# Altium PCB ModuMIDI.PcbDoc (part 2 of 2)
Units mil, origin at the board's own origin, x right, y up, seen from the top; angles counter-clockwise.
Board outline 9987.45 x 7920 mil, 2 copper layers (Top Layer, Bottom Layer), stack 62.19 mil thick; 170 components, 117 nets, 494 pads, 132 vias.
Unrouted connection lines stored in the file: 1.
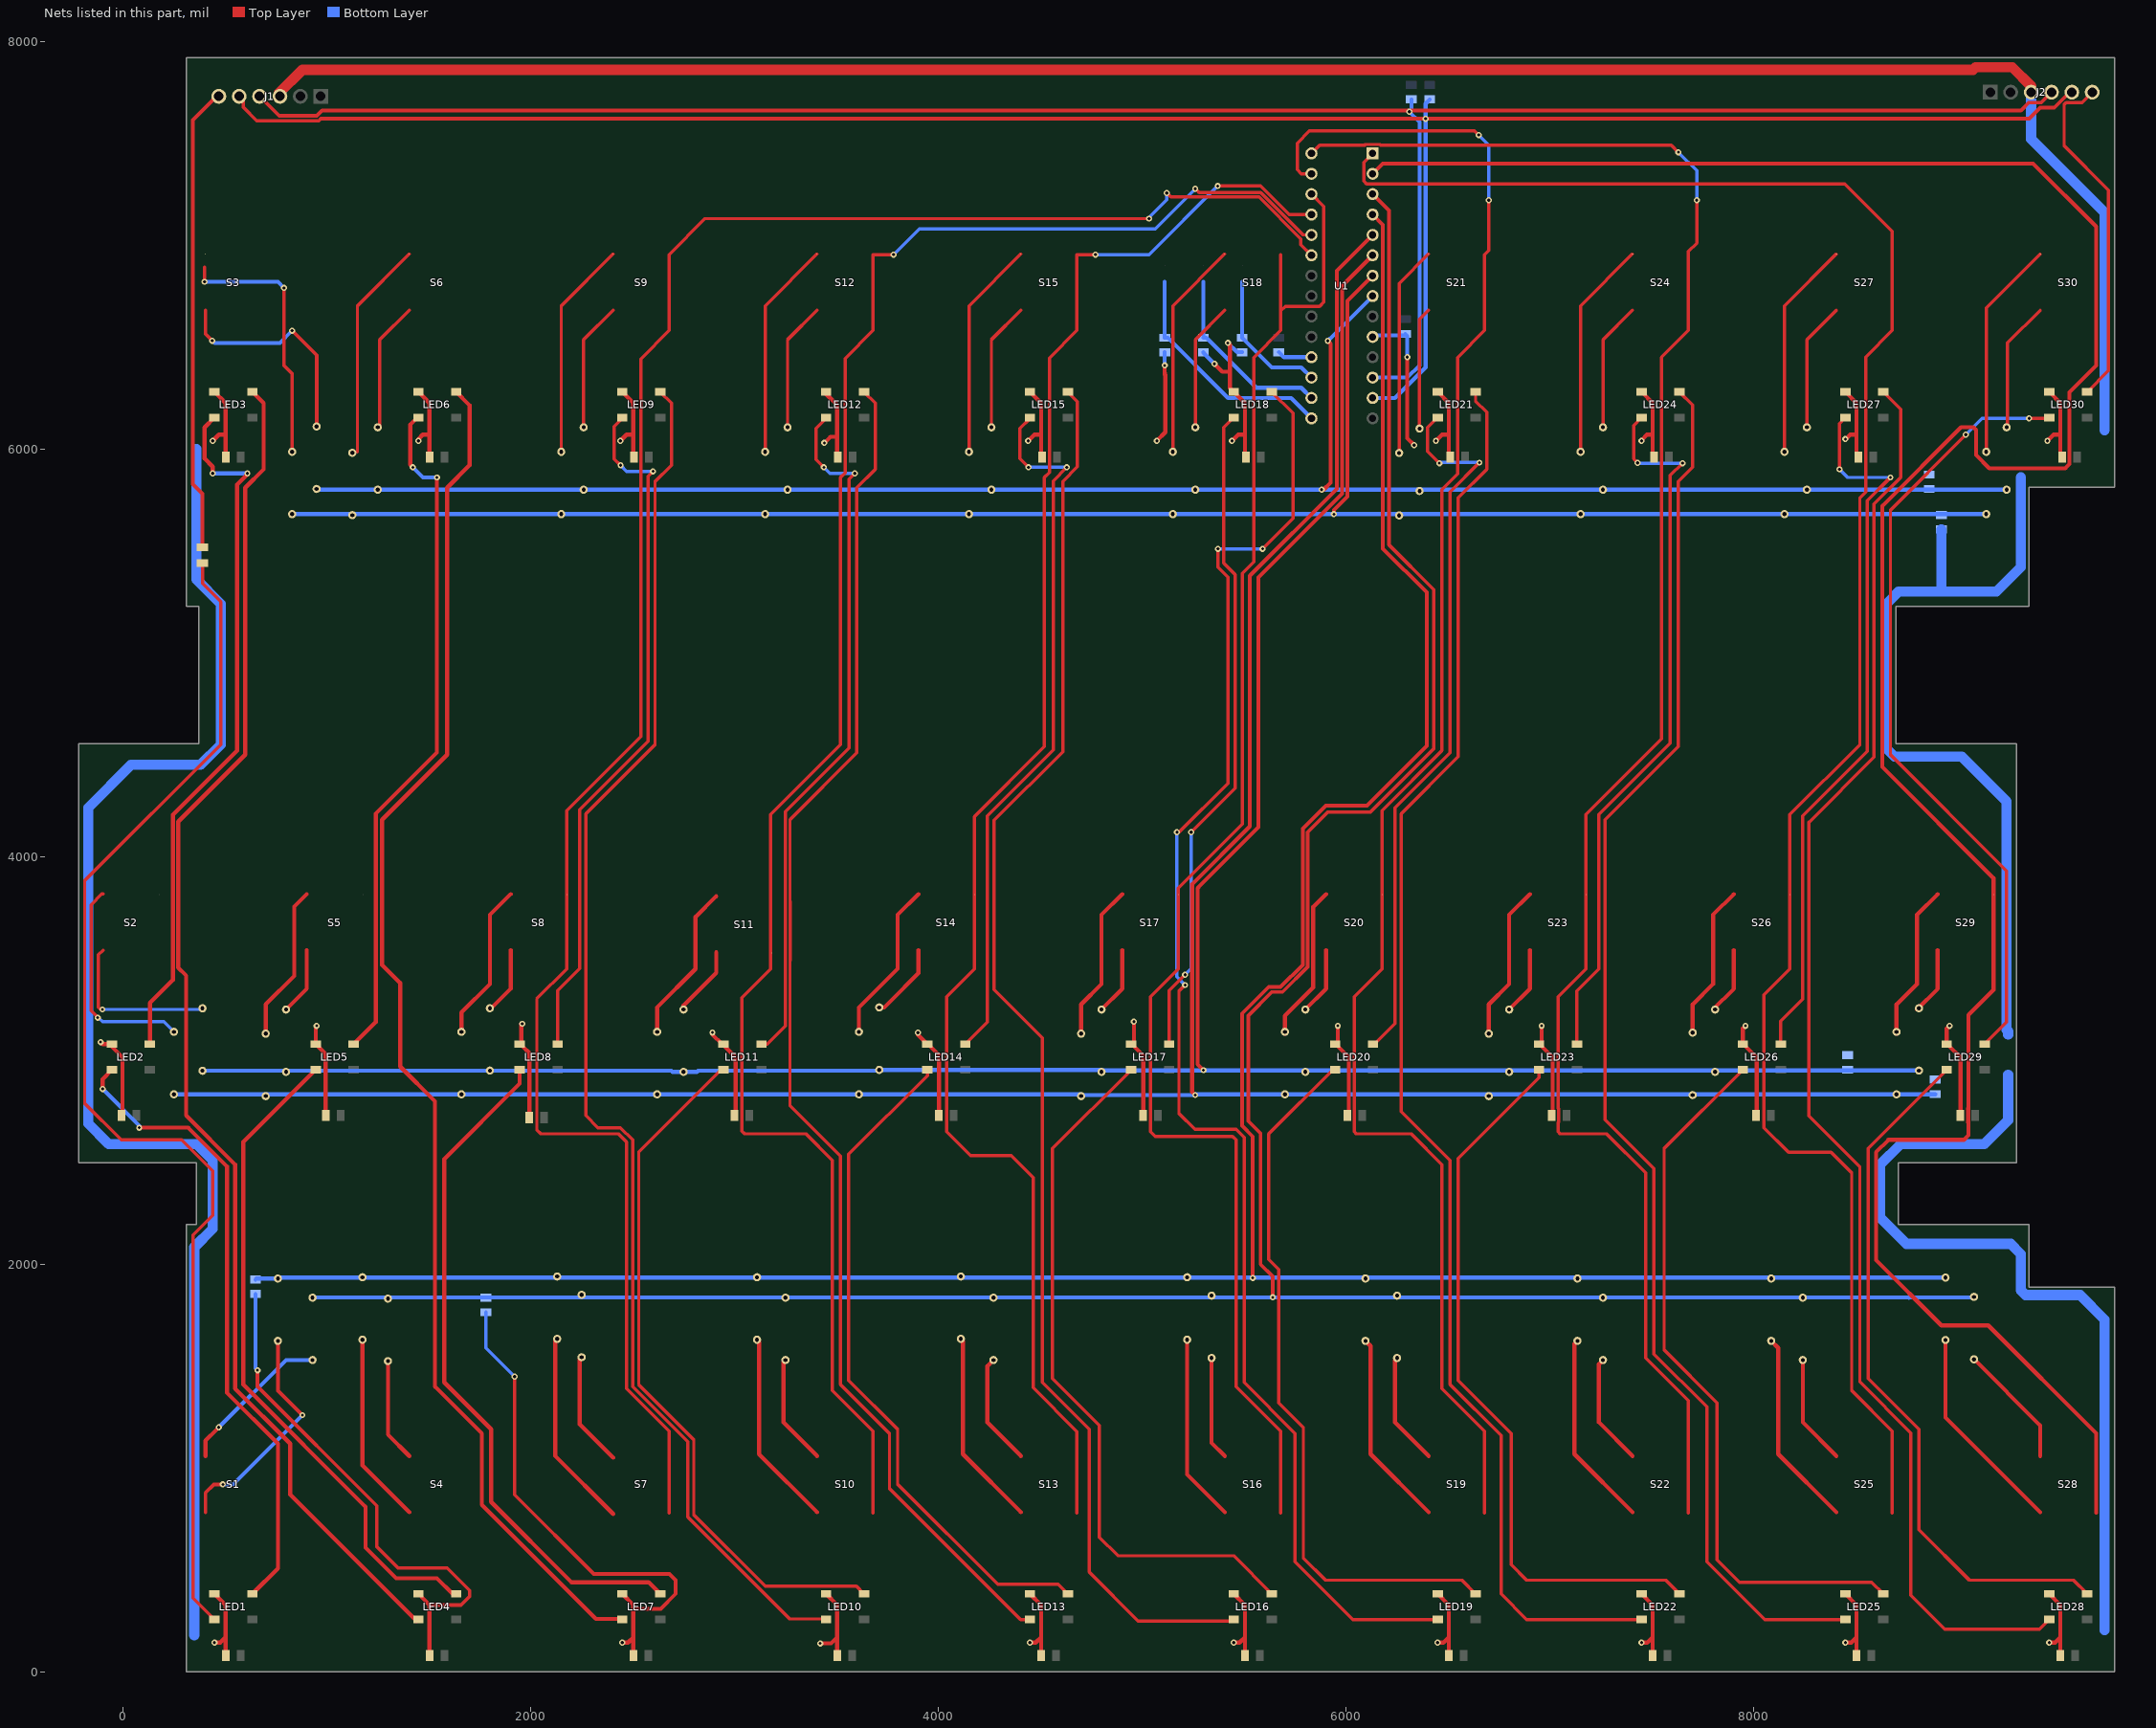
[diagram p2: the nets of this part, all layers, seen from the top]

## Via types
v1: diameter 30, hole 15, Top Layer to Bottom Layer, 123 vias
v2: diameter 60, hole 30, Top Layer to Bottom Layer, tented top, 9 vias

## Nets (pads, with @x,y where several pads share a name; then routed paths per layer and width w, separated by ;. In a path a pad name is that pad's centre, name@x,y a point inside that pad or via, vN(x,y) a via of type N, cw(c..) or ccw(c..) an arc to the next point about the centre after c; other vN are vias at no path point) (continued)
C2: S7.1 S7.3 S8.1 S8.3 S9.1 S9.3 U1.23 | length 10374.1
  Top Layer w16: S7.3@2679.17,780.63 S7.1@2679.17,1056.22 2679.17,1180.83 2470,1390 2470,2600 2430,2640 2050,2640 2030,2660 2030,3302 2176.17,3448.17 S8.3@2176.17,3537.63 S8.1@2176.17,3813.22 2176.17,4226.17 2540,4590 2540,6441.78 2679.17,6580.94 S9.3@2679.17,6677.63 S9.1@2679.17,6953.22 2855.94,7130 v1(5033.22,7130) ; v1(5120,7254.98) 5121.02,7254.98 5140,7236 5572.28,7236 5777.17,7031.12 5777.17,7002.83 U1.23@5830,6950
  Bottom Layer w16: v1(5033.22,7130) 5033.22,7136.42 5120,7223.2 v1(5120,7254.98)
C3: S10.1 S10.3 S11.1 S11.3 S12.1 S12.3 U1.24 | length 9259.1
  Top Layer w16: S10.3@3679.17,780.63 S10.1@3679.17,1056.22 3679.17,1180.83 3480,1380 3480,2510 3350,2640 3050,2640 3036.67,2653.33 3036.67,3308.67 3176.17,3448.17 3176.17,3802.54 3176.17,4206.17 3520,4550 3520,5860 3542.48,5882.48 3542.48,6444.26 3679.17,6580.94 S12.3@3679.17,6677.63 S12.1@3679.17,6953.22 v1(3780,6953.22) ; v1(5260,7276.45) 5269.83,7266.62 5270,7266.62 5278.62,7258 5581.4,7258 5789.4,7050 U1.24@5830,7050
  Bottom Layer w16: v1(3780,6953.22) 3906.78,7080 4404.83,7080 5063.55,7080 v1(5260,7276.45)
C4: S13.1 S13.3 S14.1 S14.3 S15.1 S15.3 U1.25 | length 8168
  Top Layer w16: S13.3@4679.17,780.63 S13.1@4679.17,1056.22 4679.17,1179.72 4464.97,1393.92 4464.97,2425.8 4357.87,2532.9 4157.1,2532.9 4040,2650 4040,3312 4176.17,3448.17 S14.3@4176.17,3537.63 S14.1@4176.17,3813.22 4176.17,4196.17 4520,4540 4520,5860 4544.4,5884.4 4544.4,6095.6 4544.4,6446.18 4679.17,6580.94 S15.3@4679.17,6677.63 S15.1@4679.17,6953.22 v1(4770,6953.22) ; v1(5370,7290) 5580.51,7290 5720.51,7150 U1.25@5830,7150
  Bottom Layer w16: v1(4770,6953.22) 5033.22,6953.22 v1(5370,7290)
C5: S16.1 S16.3 S17.1 S17.3 S18.1 S18.3 U1.26 | length 7707.9
  Top Layer w16: S16.3@5679.17,780.63 S16.1@5679.17,1056.22 5679.17,1180.83 5460,1400 5460,2610 5442.78,2627.22 5062.78,2627.22 5040,2650 5040,3312 5176.17,3448.17 S17.3@5176.17,3537.63 S17.1@5176.17,3813.22 5176.17,3846.17 5490,4160 5490,5390 5546.51,5446.51 5546.51,6448.29 5679.17,6580.94 S18.3@5679.17,6677.63 ; S18.1@5679.17,6953.22 S18.3@5679.17,6677.63 ; U1.26@5830,7250 5890,7190 5890,6720 5870,6700 5701.54,6700 S18.3@5679.17,6677.63
C6: S19.1 S19.3 S20.1 S20.3 S21.1 S21.3 U1.27 | length 8607.1
  Top Layer w16: U1.27@5830,7350 5780,7350 5760,7370 5760,7500 5820,7560 6630,7560 v1(6650,7540) ; S19.3@6679.17,780.63 S19.1@6679.17,1056.22 6679.17,1180.83 6470,1390 6470,2488.89 6318.89,2640 6050,2640 6040,2650 6040,3312 6176.17,3448.17 S20.3@6176.17,3537.63 S20.1@6176.17,3813.22 6176.17,4226.17 6470,4520 6470,5800 6546.79,5876.79 6546.79,5989.52 6546.79,6448.57 6679.17,6580.94 S21.3@6679.17,6677.63 S21.1@6679.17,6953.22 6700,6974.06 v1(6700,7220)
  Bottom Layer w16: v1(6650,7540) 6700,7490 v1(6700,7220)
C7: S22.1 S22.3 S23.1 S23.3 S24.1 S24.3 U1.28 | length 9227.1
  Top Layer w16: U1.28@5830,7450 5870,7490 6091.15,7490 6094.67,7493.53 6165.33,7493.53 6168.85,7490 7595.2,7490 v1(7629.7,7455.5) ; S22.3@7679.17,780.63 S22.1@7679.17,1056.22 7679.17,1330.83 7470,1540 7470,2447.77 7277.77,2640 7050,2640 7040,2650 7040,2694.8 7041.84,2696.64 7041.84,2763.36 7040,2765.2 7040,3312 7176.17,3448.17 S23.3@7176.17,3537.63 S23.1@7176.17,3813.22 7176.17,4206.17 7547.61,4577.61 7547.61,6449.39 7679.17,6580.94 S24.3@7679.17,6677.63 S24.1@7679.17,6953.22 7679.17,6969.17 7720,7010 v1(7720,7220)
  Bottom Layer w16: v1(7629.7,7455.5) 7720,7365.2 v1(7720,7220)
C8: S25.1 S25.3 S26.1 S26.3 S27.1 S27.3 U1.1 | length 9779.2
  Top Layer w16: U1.1@6130,7450 6086.47,7406.47 6086.47,7313.53 6100,7300 8446.06,7300 8679.17,7066.89 S27.1@8679.17,6953.22 S27.3@8679.17,6677.63 8679.17,6580.94 8549.09,6450.87 8549.09,5789.09 8520,5760 8520,4550 8176.17,4206.17 S26.1@8176.17,3813.22 S26.3@8176.17,3537.63 8176.17,3448.17 8050,3322 8050,2670 8170,2550 8378.89,2550 8480,2448.89 8480,1380 8679.17,1180.83 S25.1@8679.17,1056.22 S25.3@8679.17,780.63
C9: S28.1 S28.3 S29.1 S29.3 S30.1 S30.3 U1.2 | length 12363.7
  Top Layer w20: U1.2@6130,7350 6180,7400 9370,7400 9679.17,7090.83 S30.1@9679.17,6953.22 S30.3@9679.17,6677.63 9679.17,6409.17 9547.95,6277.95 9547.95,5994.52 9548.28,5994.19 9548.28,5925.81 9527.47,5905 9155,5905 9090,5970 9090,6093.14 9076.95,6106.18 9016.18,6106.18 8630,5720 8630,4440 9176.17,3893.83 S29.1@9176.17,3813.22 S29.3@9176.17,3537.63 9176.17,3346.17 9052.95,3222.95 9052.95,2765.42 9051.72,2764.19 9051.72,2695.81 9052.95,2694.58 9052.95,2632.64 9030.31,2610 8660,2610 8600,2550 8600,2020 8920,1700 9150,1700 9679.17,1170.83 S28.1@9679.17,1056.22 S28.3@9679.17,780.63
CLK: J1.4 J2.4 R6.1 U1.12 | length 10464.7
  Top Layer w18: J1.4@670,7730 766.18,7633.82 951.02,7633.82 977.2,7660 v1@6310,7660 ; v1(6310,7654) 6316,7660 9310,7660 9348.78,7698.78 9408.78,7698.78 J2.4@9460,7750
  Bottom Layer w18: U1.12@6130,6350 6300,6350 6360,6410 6360,7604 v1(6310,7654) 6320,7664 R6.1@6320,7714.57
Data: J1.5 J2.5 R5.1 U1.13 | length 10754.4
  Top Layer w18: J1.5@590,7730.06 590,7676.14 656.32,7609.82 960.96,7609.82 971.14,7620 v1(6390,7620) 9350,7620 9404.78,7674.78 9473.89,7674.78 9549.11,7750 J2.5@9560,7750
  Bottom Layer w20: U1.13@6130,6250 6240,6250 6390,6400 v1(6390,7620) 6390,7694.57 R5.1@6410,7714.57
GND: C1.2 C2.2 C3.2 C4.2 C5.2 C6.2 C7.2 C8.2 C9.2 C10.2 C11.2 C12.2 C13.2 C14.2 C15.2 C16.2 C17.2 C18.2 C19.2 C20.2 C21.2 C22.2 C23.2 C24.2 C25.2 C26.2 C27.2 C28.2 C29.2 C30.2 C31.2 J1.3 J2.3 LED1.3 LED2.3 LED3.3 LED4.3 LED5.3 LED6.3 LED7.3 LED8.3 LED9.3 LED10.3 LED11.3 LED12.3 LED13.3 LED14.3 LED15.3 LED16.3 LED17.3 LED18.3 LED19.3 LED20.3 LED21.3 LED22.3 LED23.3 LED24.3 LED25.3 LED26.3 LED27.3 LED28.3 LED29.3 LED30.3 R0.1 R1.1 R2.1 R7.1 R8.1 R9.1 R10.1 R11.1 R12.1 U1.10 | length 44179.3
  Top Layer w18: v1(660,1480) 660,1400.23 1245.11,815.11 1245.11,614.89 1350,510 1590,510 1700.23,399.77 1700.23,370.23 1658.41,328.41 1503.58,328.41 ; LED4.3@1449,382.99 1473.71,358.28 ; v1(1920.85,1448.48) 1920.85,869.15 2310,480 2680,480 2710.57,449.43 2710.57,382.99 2637.57,310 2503.58,310
  Top Layer w20: v1(-110,3090) -100,3080 LED2.3@-70,3080 ; LED2.3@-57,3070 -2.42,3015.42 C2.2@-2.42,2750.01 ; v1(440.12,6039.52) 470.61,6070 503.58,6070 ; v1(449,143.58) 477.17,143.58 503.58,170 ; LED1.3@449,382.99 503.58,328.41 503.58,170 ; LED3.3@449,6279.99 503.58,6225.41 503.58,6070 ; C1.2@503.58,80 503.58,170 ; C3.2@503.58,5960 503.58,6070 ; v1(950,3170) 946,3166 LED5.3@946,3079.99 994.22,3031.77 C5.2@994.22,2743.99 ; v1(1449,6040) 1449,6048.39 1470.61,6070 1503.58,6070 ; LED6.3@1449,6279.99 1503.58,6225.41 1503.58,6070 ; 1473.71,358.28 1503.58,328.41 C4.2@1503.58,80 ; C6.2@1503.58,5960 1503.58,6070 ; LED8.3@1946,3079.99 1954.01,3088 1954.01,3180 v1(1959,3180) ; LED8.3@1959,3069.99 1993.58,3035.41 C8.2@1993.58,2731.99 ; v1(2440.12,6039.52) 2470.61,6070 2503.58,6070 ; v1(2449,143.58) 2477.17,143.58 2503.58,170 ; LED7.3@2449,382.99 2503.58,328.41 2503.58,310 2503.58,170 ; LED9.3@2449,6279.99 2503.58,6225.41 2503.58,6070 ; C7.2@2503.58,80 2503.58,170 ; C9.2@2503.58,5960 2503.58,6070 ; v1(2891.78,3137.04) 2891.78,3126.5 LED11.3@2937.78,3080.5 ; LED11.3@2950.78,3070.5 3005.36,3015.92 C11.2@3005.36,2750.51 ; v1(3420,140) 3473.58,140 3503.58,170 ; v1(3440.12,6029.52) 3470.61,6060 3503.58,6060 ; LED10.3@3449,382.99 3503.58,328.41 3503.58,170 ; LED12.3@3449,6269.99 3503.58,6215.41 3503.58,6060 ; C10.2@3503.58,80 3503.58,170 ; C12.2@3503.58,5950 3503.58,6060 ; v1(3900,3136.53) 3900,3125.99 LED14.3@3946,3079.99 ; LED14.3@3959,3069.99 4002.47,3026.52 C14.2@4002.47,2730 ; v1(4440.12,6039.52) 4470.61,6070 4503.58,6070 ; v1(4449,143.58) 4477.17,143.58 4503.58,170 ; LED13.3@4449,382.99 4503.58,328.41 4503.58,170 ; LED15.3@4449,6279.99 4503.58,6225.41 4503.58,6070 ; C13.2@4503.58,80 4503.58,170 ; C15.2@4503.58,5960 4503.58,6070 ; LED17.3@4946,3079.99 4959,3092.99 v1(4959,3190) ; LED17.3@4959,3069.99 5004.69,3024.3 C17.2@5004.69,2730 ; v1(5071.39,6040.1) 5113.38,6082.08 5113.38,6362.63 5111.07,6364.94 5111.07,6371.34 5110,6372.41 v1(5110,6410) ; v1(5353.96,6417.68) 5392.64,6379 5430,6379 ; v1(5420,6520) 5430,6510 5430,6379 ; v1(5440.12,6039.52) 5470.61,6070 5503.58,6070 ; v1(5449,143.58) 5477.17,143.58 5503.58,170 ; LED16.3@5449,382.99 5503.58,328.41 5503.58,170 ; C16.2@5503.58,80 5503.58,170 ; C18.2@5503.58,5960 5503.58,6070 ; LED20.3@5946,3079.99 5959,3092.99 v1(5959,3170) ; LED20.3@5959,3069.99 6013.58,3015.41 C20.2@6013.58,2750 ; v1(6300,6450) 6300,6052.45 v1(6333.94,6018.52) ; v1(6440.12,6039.52) 6470.61,6070 6503.58,6070 ; v1(6449,143.58) 6477.17,143.58 6503.58,170 ; LED19.3@6449,382.99 6503.58,328.41 6503.58,170 ; LED21.3@6449,6279.99 6503.58,6225.41 6503.58,6070 ; C19.2@6503.58,80 6503.58,170 ; C21.2@6503.58,5960 6503.58,6070 ; LED23.3@6946,3079.99 6960,3093.99 6959,3094.99 v1(6959,3170) ; LED23.3@6959,3069.99 7013.58,3015.41 C23.2@7013.58,2750 ; v1(7449,143.58) 7477.17,143.58 7503.58,170 ; LED22.3@7449,382.99 7503.58,328.41 7503.58,170 ; v1(7449,6039.52) 7449,6042.22 7463.58,6056.8 7463.58,6058.28 7475.3,6070 7503.58,6070 ; LED24.3@7449,6279.99 7503.58,6225.41 7503.58,6070 ; C22.2@7503.58,80 7503.58,170 ; C24.2@7503.58,5960 7503.58,6070 ; LED26.3@7946,3079.99 7946,3157 v1(7959,3170) ; LED26.3@7959,3069.99 8013.58,3015.41 C26.2@8013.58,2750 ; v1(8449,143.58) 8477.17,143.58 8503.58,170 ; LED25.3@8449,382.99 8503.58,328.41 8503.58,170 ; v1(8449,6048.39) 8451.71,6048.39 8473.31,6070 8503.58,6070 ; LED27.3@8449,6279.99 8503.58,6225.41 8503.58,6070 ; C25.2@8503.58,80 8503.58,170 ; C27.2@8503.58,5960 8503.58,6070 ; LED29.3@8946,3079.99 8946,3156 v1(8960,3170) ; LED29.3@8959,3069.99 9013.58,3015.41 C29.2@9013.58,2750 ; v1(9440.12,6039.52) 9470.61,6070 9503.58,6070 ; v1(9449,143.58) 9477.17,143.58 9503.58,170 ; LED28.3@9449,382.99 9503.58,328.41 9503.58,170 ; LED30.3@9449,6279.99 9503.58,6225.41 9503.58,6070 ; C28.2@9503.58,80 9503.58,170 ; C30.2@9503.58,5960 9503.58,6070 ; 5430,6379 5430,6298.99 LED18.3@5449,6279.99 5503.58,6225.41 5503.58,6070
  Top Layer w50: J1.3@764.61,7744.61 880,7860 9074.52,7860 9087.74,7873.22 9266.78,7873.22 9360,7780 J2.3@9360,7750
  Bottom Layer w18: R8.1@650,1854.57 650,1490 v1(660,1480) ; R7.1@1780,1764.57 1780,1589.34 v1(1920.85,1448.48)
  Bottom Layer w20: v1(5110,6410) R0.1@5110,6474.57 ; R1.1@5300,6474.57 5300,6471.64 v1(5353.96,6417.68) ; v1(5420,6520) 5465.43,6474.57 R2.1@5490,6474.57 ; U1.10@6130,6550 6136.69,6556.69 6283.11,6556.69 C31.2@6290,6563.58 6300,6553.58 v1(6300,6450)
  Bottom Layer w50: 350,180.37 350,2084 440,2174 440,2510 360,2590 -70,2590 -170,2690 -170,4240 40,4450 380,4450 480,4550 480,5240 360,5360 360,6000 ; R11.1@8920,5604.57 8920,5310 8930,5300 ; 9247.47,2930 9247.47,2707.47 9130,2590 8720,2590 8620,2490 8620,2228.97 8668.97,2180 8668.97,2179.65 8692.4,2156.22 8692.75,2156.22 8748.97,2100 9260.22,2100 9310.22,2050 9310.22,1872.11 9333.65,1848.68 9600,1848.68 9720,1728.68 9720,205.23 ; 9247.47,3127.52 9247.47,3142.53 9240,3150 9240,4270 9020,4490 8690,4490 8650,4530 8650,5240 8710,5300 8930,5300 ; 9310,5860 9310.22,5859.78 9310.22,5778.1 9310,5777.88 9310,5420 9190,5300 8930,5300 ; J2.3@9360,7749.26 9360,7520 9720,7160 9720,6092.37
LED_CTRL: J1.6 R4.1 | length 2281.4
  Top Layer w18: R4.1@390,5516.77 390,5780 342.83,5827.17 342.83,7612.6 J1.6@460.24,7730
LED_Next: J2.6 LED30.2 | length 1706.8
  Top Layer w16: LED30.2@9635,6279.99 9740,6384.99 9740,7270 9522.05,7487.95 9522.05,7690.41 9531.42,7699.78 9609.78,7699.78 J2.6@9660,7750
NetD1_2: D1.2 S1.0 | length 764.3
  Top Layer w20: S1.0@404.83,1059.37 404.83,1134.83 460,1190 v1(470,1200)
  Bottom Layer w20: v1(470,1200) 800,1530 D1.2@930,1530
NetD2_2: D2.2 S1.2 | length 1141.6
  Top Layer w18: S1.2@404.83,783.78 404.83,878.83 446,920 v1(490,920) ; D2.2@760,1623.82 760,1380 v1(880,1260)
  Bottom Layer w18: v1(490,920) 540,920 v1(880,1260)
NetD3_2: D3.2 S2.0 | length 1050.2
  Top Layer w16: v1(-124,3210) -124,3211.47 -156.5,3243.97 -156.5,3763.5 -103.63,3816.37 S2.0@-98.17,3816.37
  Bottom Layer w16: v1(-124,3210) -120.21,3210 -100.21,3190 200,3190 D3.2@250,3140
NetD4_2: D4.2 S2.2 | length 806.3
  Top Layer w16: v1(-101,3250) -110,3250 -120,3260 -120,3518.95 S2.2@-98.17,3540.78
  Bottom Layer w16: v1(-101,3250) 384.34,3250 D4.2@390,3255.66
NetD5_2: D5.2 S3.0 | length 1294.3
  Top Layer w18: v1(400,6820) 400,6891.54 ; v1(790,6790) 790,6409.44 830,6369.44 D5.2@830,5986.18
  Bottom Layer w18: v1(400,6820) 760,6820 v1(790,6790)
NetD6_2: D6.2 S3.2 | length 1104.9
  Top Layer w18: S3.2@404.83,6680.78 404.83,6563.73 v1(437.51,6531.05) ; v1(830,6580) 950,6460 D6.2@950,6110
  Bottom Layer w18: v1(437.51,6531.05) 438.95,6531.05 450,6520 770,6520 v1(830,6580)
NetD7_2: D7.2 S4.0 | length 509.1
  Top Layer w20: D7.2@1300,1525 1300,1164.2 S4.0@1404.83,1059.37
NetD8_2: D8.2 S4.2 | length 941.4
  Top Layer w20: D8.2@1175,1630 1175,1013.61 S4.2@1404.83,783.78
NetD9_2: D9.2 S5.0 | length 768.8
  Top Layer w20: D9.2@700,3131.18 700,3275 840,3415 840,3754.54 S5.0@901.83,3816.37
NetD10_2: D10.2 S5.2 | length 333
  Top Layer w20: D10.2@800,3250 901.83,3351.83 S5.2@901.83,3540.78
NetD11_2: D11.2 S6.0 | length 1075.7
  Top Layer w16: 1150,5986.18 1150,6306.18 1150,6701.54 S6.0@1404.83,6956.37
NetD12_2: D12.2 S6.2 | length 634.6
  Top Layer w16: D12.2@1260,6106.18 1260,6426.18 1260,6535.94 S6.2@1404.83,6680.78
NetD13_2: D13.2 S7.0 | length 565.6
  Top Layer w20: D13.2@2250,1543.82 2240,1533.82 2240,1215.43 2404.83,1050.59
NetD14_2: D14.2 S7.2 | length 980.9
  Top Layer w20: D14.2@2130,1633.82 2120,1623.82 2120,1059.83 2404.83,775
NetD15_2: D15.2 S8.0 | length 776.5
  Top Layer w20: D15.2@1660,3140 1660,3144.85 1660,3235 1800,3375 1800,3714.54 S8.0@1901.83,3816.37
NetD16_2: D16.2 S8.2 | length 333
  Top Layer w20: D16.2@1800,3250 1901.83,3351.83 S8.2@1901.83,3540.78
NetD17_2: D17.2 S9.0 | length 1075.7
  Top Layer w16: D17.2@2150,5986.18 2150,6306.18 2150,6701.54 S9.0@2404.83,6956.37
NetD18_2: D18.2 S9.2 | length 634.6
  Top Layer w16: D18.2@2260,6106.18 2260,6426.18 2260,6535.94 S9.2@2404.83,6680.78
NetD19_2: D19.2 S10.0 | length 543
  Top Layer w20: D19.2@3250,1530 3240,1520 3240,1224.2 S10.0@3404.83,1059.37
NetD20_2: D20.2 S10.2 | length 968.3
  Top Layer w20: D20.2@3110,1630 3120,1620 3120,1068.61 S10.2@3404.83,783.78
NetD21_2: D21.2 S11.0 | length 785.8
  Top Layer w20: D21.2@2620,3140 2620,3260 2808.17,3448.17 2808.17,3703.86 S11.0@2910.01,3805.69
NetD22_2: D22.2 S11.2 | length 346.4
  Top Layer w20: D22.2@2750,3250 2750,3270 2910.01,3430.01 S11.2@2910.01,3530.1
NetD23_2: D23.2 S12.0 | length 1075.7
  Top Layer w16: D23.2@3150,5986.18 3150,6306.18 3150,6701.54 S12.0@3404.83,6956.37
NetD24_2: D24.2 S12.2 | length 634.6
  Top Layer w16: D24.2@3260,6106.18 3260,6426.18 3260,6535.94 S12.2@3404.83,6680.78
NetD25_2: D25.2 S13.0 | length 551.3
  Top Layer w20: D25.2@4270,1530 4240,1500 4240,1224.2 S13.0@4404.83,1059.37
NetD26_2: D26.2 S13.2 | length 972.6
  Top Layer w20: D26.2@4109.87,1634.16 4120,1624.03 4120,1068.61 S13.2@4404.83,783.78
NetD27_2: D27.2 S14.0 | length 797.3
  Top Layer w20: D27.2@3610,3140 3610,3260 3800,3450 3800,3714.54 S14.0@3901.83,3816.37
NetD28_2: D28.2 S14.2 | length 374.2
  Top Layer w20: D28.2@3710,3260 3715.41,3260 3733.82,3260 3764.34,3290.52 3901.83,3428.02 S14.2@3901.83,3540.78
NetD29_2: D29.2 S15.0 | length 1075.7
  Top Layer w16: D29.2@4150,5986.18 4150,6306.18 4150,6701.54 S15.0@4404.83,6956.37
NetD30_2: D30.2 S15.2 | length 634.6
  Top Layer w16: D30.2@4260,6106.18 4260,6426.18 4260,6535.94 S15.2@4404.83,6680.78
NetD31_2: D31.2 S16.0 | length 507.5
  Top Layer w20: D31.2@5340,1540 5340,1124.2 S16.0@5404.83,1059.37
NetD32_2: D32.2 S16.2 | length 922.8
  Top Layer w20: D32.2@5220,1630 5220,968.61 S16.2@5404.83,783.78
NetD33_2: D33.2 S17.0 | length 768.8
  Top Layer w20: D33.2@4700,3131.18 4700,3275 4800,3375 4800,3714.54 S17.0@4901.83,3816.37
NetD34_2: D34.2 S17.2 | length 333
  Top Layer w20: D34.2@4800,3250 4901.83,3351.83 S17.2@4901.83,3540.78
NetD35_2: D35.2 S18.0 | length 1075.7
  Top Layer w16: D35.2@5150,5986.18 5150,6306.18 5150,6701.54 S18.0@5404.83,6956.37
NetD36_2: D36.2 S18.2 | length 634.6
  Top Layer w16: D36.2@5260,6106.18 5260,6426.18 5260,6535.94 S18.2@5404.83,6680.78
NetD37_2: D37.2 S19.0 | length 553
  Top Layer w20: D37.2@6250,1540 6240,1530 6240,1224.2 S19.0@6404.83,1059.37
NetD38_2: D38.2 S19.2 | length 968.8
  Top Layer w20: D38.2@6094.87,1624.16 6120,1599.03 6120,1068.61 S19.2@6404.83,783.78
NetD39_2: D39.2 S20.0 | length 768.8
  Top Layer w20: D39.2@5700,3131.18 5700,3219 5838.67,3357.67 5838.67,3753.21 S20.0@5901.83,3816.37
NetD40_2: D40.2 S20.2 | length 333
  Top Layer w20: D40.2@5800,3250 5901.83,3351.83 S20.2@5901.83,3540.78
NetD41_2: D41.2 S21.0 | length 1030.6
  Top Layer w16: D41.2@6260,5985.77 6260,6811.54 S21.0@6404.83,6956.37
NetD42_2: D42.2 S21.2 | length 599.8
  Top Layer w16: D42.2@6360,6099.52 6360,6635.94 S21.2@6404.83,6680.78
NetD43_2: D43.2 S22.0 | length 547.2
  Top Layer w20: D43.2@7260,1530 7240,1510 7240,1224.2 S22.0@7404.83,1059.37
NetD44_2: D44.2 S22.2 | length 964.5
  Top Layer w20: D44.2@7134.87,1624.16 7120,1609.28 7120,1068.61 S22.2@7404.83,783.78
NetD45_2: D45.2 S23.0 | length 768.8
  Top Layer w20: D45.2@6700,3131.18 6700,3275 6800,3375 6800,3714.54 S23.0@6901.83,3816.37
NetD46_2: D46.2 S23.2 | length 333
  Top Layer w20: D46.2@6800,3250 6901.83,3351.83 S23.2@6901.83,3540.78
NetD47_2: D47.2 S24.0 | length 1075.7
  Top Layer w16: D47.2@7150,5986.18 7150,6306.18 7150,6701.54 S24.0@7404.83,6956.37
NetD48_2: D48.2 S24.2 | length 634.6
  Top Layer w16: D48.2@7260,6106.18 7260,6426.18 7260,6535.94 S24.2@7404.83,6680.78
NetD49_2: D49.2 S25.0 | length 538.9
  Top Layer w20: D49.2@8240,1530 8240,1224.2 S25.0@8404.83,1059.37
NetD50_2: D50.2 S25.2 | length 972.6
  Top Layer w20: D50.2@8085.32,1624.06 8120,1589.38 8120,1068.61 S25.2@8404.83,783.78
NetD51_2: D51.2 S26.0 | length 768.8
  Top Layer w20: D51.2@7700,3131.18 7700,3275 7800,3375 7800,3714.54 S26.0@7901.83,3816.37
NetD52_2: D52.2 S26.2 | length 333
  Top Layer w20: D52.2@7800,3250 7901.83,3351.83 S26.2@7901.83,3540.78
NetD53_2: D53.2 S27.0 | length 1075.7
  Top Layer w16: D53.2@8150,5986.18 8150,6306.18 8150,6701.54 S27.0@8404.83,6956.37
NetD54_2: D54.2 S27.2 | length 634.6
  Top Layer w16: D54.2@8260,6106.18 8260,6426.18 8260,6535.94 S27.2@8404.83,6680.78
NetD55_2: D55.2 S28.0 | length 609
  Top Layer w20: D55.2@9080,1533.82 9404.83,1208.98 S28.0@9404.83,1059.37
NetD56_2: D56.2 S28.2 | length 1037.2
  Top Layer w20: D56.2@8940,1628.45 8940,1248.61 S28.2@9404.83,783.78
NetD57_2: D57.2 S29.0 | length 768.8
  Top Layer w20: D57.2@8700,3131.18 8700,3275 8800,3375 8800,3714.54 S29.0@8901.83,3816.37
NetD58_2: D58.2 S29.2 | length 333
  Top Layer w20: D58.2@8800,3250 8901.83,3351.83 S29.2@8901.83,3540.78
NetD59_2: D59.2 S30.0 | length 1079.9
  Top Layer w16: D59.2@9140,5986.18 9140,6691.54 S30.0@9404.83,6956.37
NetD60_2: D60.2 S30.2 | length 642.9
  Top Layer w16: D60.2@9240,6106.18 9244.59,6110.77 9244.59,6142.77 9244.59,6520.54 S30.2@9404.83,6680.78
NetLED1_2: LED1.2 LED2.4 | length 3138.7
  Top Layer w20: v1(-100,2860) -100,2908.01 LED2.4@-54,2954.01 ; v1(80,2670) 320,2670 510,2480 510,1370 760,1120 760,507.99 LED1.2@635,382.99
  Bottom Layer w20: v1(-100,2860) 80,2680 v1(80,2670)
NetLED1_4: LED1.4 R4.2 | length 6013.1
  Top Layer w16: R4.2@390,5440 390,5340 480,5250 480,4550 -187.73,3882.27 -187.73,2789.54 -8.19,2610 287.7,2610 440,2457.7 440,2240 344.37,2144.37 344.37,361.64 LED1.4@449,257.01
NetLED2_2: LED2.2 LED3.4 | length 3478.8
  Top Layer w20: LED2.2@132,3079.99 132,3282 245.03,3395.03 245.03,4205.03 560,4520 560,5825 610,5875 v1(610,5880) ; v1(440.12,5880) 440.12,5913.17 400,5953.29 400,6105.01 LED3.4@449,6154.01
  Bottom Layer w20: v1(440.12,5880) v1(610,5880)
NetLED3_2: LED3.2 LED4.4 | length 6719.5
  Top Layer w20: LED3.2@635,6279.99 690,6224.99 690,5900 600,5810 600,4500 271.03,4171.03 271.03,3455 310,3416.03 310,2842.91 310,2730 550,2490 550,1390 820,1120 820,870 LED4.4@1440,250 ; LED4.4@1440,257.01 LED4.4@1449,257.01
NetLED4_2: LED4.2 LED5.4 | length 3286.7
  Top Layer w20: LED5.4@950,2960 590,2600 590,1410 1190,810 1190,610 1340,460 1540,460 1617.01,382.99 LED4.2@1635,382.99
NetLED5_2: LED5.2 LED6.4 | length 3359.3
  Top Layer w20: LED5.2@1132,3079.99 1240,3187.99 1240,4210 1540,4510 v1(1540,5860) ; v1(1421.9,5910) 1410,5921.9 1410,6120 LED6.4@1450,6160
  Bottom Layer w20: v1(1421.9,5910) 1471.9,5860 v1(1540,5860)
NetLED6_2: LED6.2 LED7.4 | length 6779.1
  Top Layer w20: LED6.2@1635,6279.99 1700,6214.99 1700,5920 1590,5810 1590,5155.71 1590,4500 1271.04,4181.04 1271.04,3468.92 1360,3379.95 1360,2970 1530,2800 1530,1400 1760,1170 1760,820 2320,260 LED7.4@2440,260
NetLED7_2: LED7.2 LED8.4 | length 3384.3
  Top Layer w20: LED8.4@1946,2954.01 1946,2886 1576,2516 1576,1420.77 1806,1190.77 1806,834 2200,440 2577.99,440 LED7.2@2635,382.99
NetLED8_2: LED8.2 LED9.4 | length 3434.7
  Top Layer w16: LED8.2@2132,3079.99 2132,3342 2240,3450 2240,4230 2575.16,4565.16 2575.16,5865.16 v1(2600,5890) ; v1(2441,5920) 2410,5951 2410,6110 LED9.4@2450,6150
  Bottom Layer w16: v1(2441,5920) 2471,5890 v1(2600,5890)
NetLED9_2: LED9.2 LED10.4 | length 6865.4
  Top Layer w16: LED9.2@2635,6279.99 2690,6224.99 2690,5920 2610,5840 2610,4550 2270,4210 2270,2730 2330,2670 2440,2670 2500,2610 2500,1400 2770,1130 2770,760 3270,260 LED10.4@3440,260
NetLED10_2: LED10.2 LED11.4 | length 3452.8
  Top Layer w16: LED11.4@2930,2950 2530,2550 2530,1410 2800,1140 2800,770 3150,420 3597.99,420 LED10.2@3635,382.99
NetLED11_2: LED11.2 LED12.4 | length 3447.6
  Top Layer w16: LED11.2@3130,3080 3160,3080 3250,3170 3250,3320 ; 3250,3321.51 3250,4220 3562,4532 3562,5852 v1(3590,5880) ; v1(3437.8,5910) 3400,5947.8 3400,6100 LED12.4@3450,6150
  Bottom Layer w16: v1(3437.8,5910) 3467.8,5880 v1(3590,5880)
NetLED12_2: LED12.2 LED13.4 | length 6734.3
  Top Layer w16: LED12.2@3635,6279.99 3690,6224.99 3690,5900 3600,5810 3600,4510 3272,4182 3272,3780 3273.08,3778.92 3273.08,3490 3272,3488.92 3272,2778 3520,2530 3520,1410 3760,1170 3760,900 4402.99,257.01 LED13.4@4449,257.01
NetLED13_2: LED13.2 LED14.4 | length 3350.1
  Top Layer w16: LED14.4@3946,2954.01 3946,2926 3560,2540 3560,1430 3800,1190 3800,921.11 4291.11,430 4587.99,430 LED13.2@4635,382.99
NetLED14_2: LED14.2 LED15.4 | length 3502.5
  Top Layer w16: LED14.2@4132,3079.99 4240,3187.99 4240,4200 4563.13,4523.13 4563.13,5843.13 v1(4630,5910) ; v1(4441.9,5910) 4400,5951.9 4400,6100 LED15.4@4450,6150
  Bottom Layer w16: v1(4441.9,5910) v1(4630,5910)
NetLED15_2: LED15.2 LED16.4 | length 6981.7
  Top Layer w16: LED15.2@4635,6279.99 4682,6232.99 4682,6137.21 4682,5912 4610,5840 4610,4514.85 4273.07,4177.92 4273.07,3844.21 4273.07,3469.47 4273.07,3348.49 4510,3111.56 4510,1420 4740,1190 4740,490 4980,250 LED16.4@5450,250
NetLED16_2: LED16.2 LED17.4 | length 3508.9
  Top Layer w16: LED17.4@4946,2954.01 4560,2568.01 4560,1440 4790,1210 4790,660 4880,570 5447.99,570 LED16.2@5635,382.99
NetLED17_2: LED17.2 LED18.4 | length 3252
  Top Layer w16: LED17.2@5132,3079.99 5132,3342 v1(5210,3420) ; v1(5240,4120) 5456.29,4336.29 5456.29,4574.9 5456.29,5383.71 5400,5440 5400,6105.01 LED18.4@5449,6154.01
  Bottom Layer w16: v1(5210,3420) 5240,3450 v1(5240,4120)
NetLED18_2: LED18.2 LED19.4 | length 7393.9
  Top Layer w16: v1(5170,4120) 5180,4120 5420,4360 5420,4569.72 5420,5370 5371,5419 v1(5371,5510) ; v1(5210,3370) 5180,3340 5180,2740 5258,2662 5459.84,2662 5500,2621.84 5500,1420 5750,1170 5750,540 6032.99,257.01 LED19.4@6449,257.01 ; v1(5590,5510) 5740,5660 5740,6174.99 LED18.2@5635,6279.99
  Bottom Layer w16: v1(5170,4120) 5170,3410 v1(5210,3370) ; v1(5371,5510) v1(5590,5510)
NetLED19_2: LED19.2 LED20.4 | length 3524.8
  Top Layer w16: LED20.4@5946,2954.01 5934.01,2954.01 5620,2640 5620,2024.22 5670,1974.22 5670,1320 5790,1200 5790,560 5900,450 6567.99,450 LED19.2@6635,382.99
NetLED20_2: LED20.2 LED21.4 | length 3539.2
  Top Layer w16: LED20.2@6132,3079.99 6139,3079.99 6240,3180.99 6240,4238.89 6510,4508.89 6510,5789.26 v1(6653.85,5933.11) ; LED21.4@6449,6154.01 6400,6105.01 6400,5987.39 v1(6457.39,5930)
  Bottom Layer w16: v1(6457.39,5930) 6460.5,5933.11 v1(6653.85,5933.11)
NetLED21_2: LED21.2 LED22.4 | length 7037.9
  Top Layer w16: LED21.2@6635,6279.99 6635,6235 6690,6180 6690,5900 6550,5760 6550,4660 6550,4490 6270,4210 6270,4190 6270,2750 6510,2510 6510,1410 6760,1160 6760,382.99 6885.98,257.01 LED22.4@7449,257.01
NetLED22_2: LED22.2 LED23.4 | length 3584
  Top Layer w16: LED23.4@6946,2954.01 6946,2916 6550,2520 6550,1430 6810,1170 6810,525.98 6885.98,450 7567.99,450 LED22.2@7635,382.99
NetLED23_2: LED23.2 LED24.4 | length 3532.2
  Top Layer w16: LED23.2@7132,3079.99 7132,3340.17 7240,3448.17 7240,4206.17 7590,4556.17 7590,5870 v1(7650,5930) ; v1(7430,5931.46) 7410,5951.46 7410,6115.01 LED24.4@7449,6154.01
  Bottom Layer w16: v1(7430,5931.46) 7431.46,5930 v1(7650,5930)
NetLED24_2: LED24.2 LED25.4 | length 6948.4
  Top Layer w16: LED24.2@7635,6279.99 7700,6214.99 7700,5910 7630,5840 7630,4540 7270,4180 7270,3841.26 7270,2710 7510,2470 7510,1560 7770,1300 7770,540 8052.99,257.01 LED25.4@8449,257.01
NetLED25_2: LED25.2 LED26.4 | length 3555.8
  Top Layer w16: LED26.4@7946,2954.01 7560,2568.01 7560,2500 7560,1580 7820,1320 7820,550 7930,440 8577.99,440 LED25.2@8635,382.99
NetLED26_2: LED26.2 LED27.4 | length 3535.4
  Top Layer w16: LED26.2@8132,3079.99 8132,3192 8240,3300 8240,4200 8556,4516 8556,5746 v1(8670,5860) ; v1(8420,5900) 8420,6125.01 LED27.4@8449,6154.01
  Bottom Layer w16: v1(8420,5900) 8460,5860 v1(8670,5860)
NetLED27_2: LED27.2 LED28.4 | length 7100.3
  Top Layer w16: LED27.2@8635,6279.99 8720,6194.99 8720,5860 8590,5730 8590,4488.49 8271.51,4170 8270,4170 8270,2727.71 8520,2477.71 8520,1422 8770,1172 8770,376.96 8936.96,210 9120,210 9401.99,210 LED28.4@9449,257.01
NetLED28_2: LED28.2 LED29.4 | length 3475.3
  Top Layer w16: LED29.4@8946,2954.01 8560,2568.01 8560,1440 8810,1190 8810,697.34 9057.34,450 9567.99,450 LED28.2@9635,382.99
NetLED29_2: LED29.2 LED30.4 | length 3867.9
  Top Layer w16: v1(9040,6070) 8670,5700 8670,4500 9240,3930 9240,3187.99 LED29.2@9132,3079.99 ; v1(9350,6150) 9444.99,6150 LED30.4@9449,6154.01
  Bottom Layer w16: v1(9040,6070) 9120,6150 v1(9350,6150)
NetR0_2: R0.2 SB0.1 U1.15 | length 1158.4
  Bottom Layer w20: SB0.1@5110,6820 R0.2@5110,6545.43 5125.25,6545.43 5420.68,6250 5730,6250 U1.15@5830,6150
NetR1_2: R1.2 SB1.1 U1.16 | length 926.9
  Bottom Layer w20: SB1.1@5300,6820 R1.2@5300,6545.43 5314.57,6545.43 5560,6300 5780,6300 U1.16@5830,6250
NetR2_2: R2.2 SB2.1 U1.17 | length 695.5
  Bottom Layer w20: SB2.1@5490,6820 R2.2@5490,6545.43 5635.43,6400 5780,6400 U1.17@5830,6350
NetR3_1: R3.1 U1.18 | length 170.2
  Bottom Layer w20: R3.1@5670,6474.57 5694.57,6450 U1.18@5830,6450
R0: D1.1 D7.1 D13.1 D19.1 D25.1 D31.1 D37.1 D43.1 D49.1 D55.1 R7.2 U1.3 | length 14269.3
  Top Layer w18: v1(5640,1837.74) 5640,1940 5580,2000 5580,2641.84 5520,2701.84 5520,3220 5636,3336 5688.17,3336 5811.37,3459.19 5811.37,4119.78 5910,4218.41 6118.41,4218.41 6430,4530 6430,5310 6210,5530 6210,6040 6210,7170 U1.3@6130,7250
  Bottom Layer w18: v1@5629.34,1837.74 v1(5640,1837.74)
  Bottom Layer w20: D1.1@930,1836.18 931.56,1837.74 1300,1837.74 2250,1837.74 3250,1837.74 4270,1837.74 5340,1837.74 v1@5629.34,1837.74 ; v1(5640,1837.74) 6250,1837.74 7260,1837.74 8240,1837.74 8730,1837.74 8757.7,1837.74 8760,1835.43 8762.3,1837.74 9077.74,1837.74 D55.1@9080,1840
R1: D2.1 D8.1 D14.1 D20.1 D26.1 D32.1 D38.1 D44.1 D50.1 D56.1 R8.2 U1.4 | length 14169.3
  Top Layer w18: v1(5541.84,1933.07) 5541.84,2627.22 5490,2679.06 5490,3230 5620,3360 5678.23,3360 5787.37,3469.13 5787.37,4137.37 5900,4250 6101.89,4250 6395.08,4543.19 6395.08,5296.06 6180,5511.14 6180,7100 U1.4@6130,7150
  Bottom Layer w20: R8.2@650,1925.43 654.57,1930 D2.1@760,1930 764.63,1934.63 820,1934.63 1175,1934.63 2130,1934.63 3110,1934.63 4109.87,1934.63 5220,1934.63 5541.84,1934.63 6094.87,1934.63 7134.87,1934.63 8085.32,1934.63 D56.1@8940,1934.63
R2: D3.1 D9.1 D15.1 D21.1 D27.1 D33.1 D39.1 D45.1 D51.1 D57.1 R9.2 U1.5 | length 13243.2
  Top Layer w20: v1(5260,2830) 5245.07,2844.93 5245.07,3865.07 5527.69,4147.69 5527.69,5377.69 5954,5804 5954,6874 U1.5@6130,7050
  Bottom Layer w20: D3.1@250,2833.82 700,2833.71 1653.71,2833.71 1653.82,2833.82 D15.1@1660,2833.82 1719.63,2833.82 1720,2833.45 2619.63,2833.45 D21.1@2620,2833.82 2776,2833.82 2776.37,2833.45 3609.63,2833.45 D27.1@3610,2833.82 3661.18,2833.82 3661.55,2833.45 4700,2833.45 D33.1@4703.45,2830 ; D33.1@4700,2825 4703.45,2828.45 D33.1@4703.45,2830 ; D57.1@8700,2833.45 5263.45,2833.45 v1(5260,2830) D33.1@4703.45,2830 ; D57.1@8700,2833.77 8889.21,2833.77 R9.2@8890,2834.57
R3: D4.1 D10.1 D16.1 D22.1 D28.1 D34.1 D40.1 D46.1 D52.1 D58.1 R10.2 U1.6 | length 12793.7
  Top Layer w20: v1(5300,2952) 5271.07,2980.93 5271.07,3468.72 5271.07,3845.11 5285.83,3859.87 5570,4144.04 5570,5370 5846,5646 5980,5780 5980,6800 U1.6@6130,6950
  Bottom Layer w20: D4.1@390,2949.48 800,2949.57 1800,2949.81 1800.22,2950.03 2690,2950.03 2696.21,2943.82 D22.1@2750,2943.82 2815,2943.82 2821.45,2950.27 3650,2950.27 3706.45,2950.27 D28.1@3710,2953.82 4800,2953.82 D34.1@4800,2943.82 ; D34.1@4800,2950.5 5298.5,2950.5 v1(5300,2952) 5301.27,2950.73 5800,2950.73 6800,2950.97 7810,2951.2 D58.1@8800,2951.43
R4: D5.1 D11.1 D17.1 D23.1 D29.1 D35.1 D41.1 D47.1 D53.1 D59.1 R11.2 U1.7 | length 9558.7
  Top Layer w20: v1(5940,5680) 5940,5700 6006,5766 6006,6726 U1.7@6130,6850
  Bottom Layer w20: D5.1@830,5680 1125,5680 D17.1@2150,5680 D23.1@3150,5680 D29.1@4150,5680 D35.1@5150,5680 v1(5940,5680) 6260,5680 D47.1@7150,5680 D53.1@8150,5680 D59.1@9140,5680
R5: D6.1 D12.1 D18.1 D24.1 D30.1 D36.1 D42.1 D48.1 D54.1 D60.1 R12.2 U1.8 | length 9362.6
  Top Layer w20: v1(5880,5800) 5890,5800 5924.04,5834.04 5924.04,6515.96 v1(5910,6530)
  Bottom Layer w20: D6.1@950,5803.82 953.82,5800 D12.1@1250,5800 D18.1@2260,5800 D24.1@3260,5800 D30.1@4260,5800 D36.1@5260,5800 v1(5880,5800) 5940,5800 6360,5800 D48.1@7260,5800 D54.1@8260,5800 D60.1@9240,5800 ; v1(5910,6530) 5940,6560 U1.8@6130,6750
pads on no net: U1.11 U1.14 U1.19 U1.20

## Polygon pours and split planes (outlines as drawn)
GND on Bottom Layer "NONET_L-01_P-001" (solid, pour order 33): -0.81,5870 -0.81,6090 9770,6090 9770,5820.81
5V_LED on Bottom Layer "NONET_L-01_P-001" (solid, pour order 38): 310,268.44 310,530 9770,530 9770,220.81
GND on Bottom Layer "NONET_L-01_P-001" (solid, pour order 37): 310,9.69 310,270 9770,270 9770,0.17
5V_LED on Bottom Layer "NONET_L-01_P-001" (solid, pour order 36): -210,3200 -210,3460 9287.47,3460 9287.47,3152.18
GND on Bottom Layer "NONET_L-01_P-001" (solid, pour order 35): -210,2940 -210,3200 9287.47,3200 9287.47,2892.18
5V_LED on Bottom Layer "NONET_L-01_P-001" (solid, pour order 34): -0.81,6090 -0.81,6390 9770,6390 9770,6085.09

## Silkscreen, mask and mechanical layers (free items; w line width, h text height)
Top Overlay:
  region: 2938 vertices and 8 holes, not listed, extent 1944.11,7369.14 2395.67,7820.01
  text "ModμMIDI - A Microtonal Keyboard" at 2510,7615.15 h200
  text "LED_CTRL" at 9652.83,7593 h35 r270
  text "SCL" at 9440,7590 h50 r270
  text "SDA" at 9559.11,7590 h50 r270
  text "5V_LED" at 9148.33,7580 h50 r270
  text "5V" at 9250,7580 h50 r270
  text "GND" at 9349.82,7580 h50 r270
  text "5V" at 900,7490 h50 r90
  text "Matthew Olson, Rush Burnes, Landon Smith, Hunter Becker, Adam Schwarzenbach" at 2510,7473.44 h100
  text "SCL" at 690,7460 h50 r90
  text "SDA" at 590,7450 h50 r90
  text "GND" at 800,7450 h50 r90
  text "5V_LED" at 987.6,7417 h30 r90
  text "LED_CTRL" at 458,7357 h30 r90
Route Guide:
  drawing of 766 lines, arcs and shapes, not listed